# Altium PCB 400535.PcbDoc (part 1 of 3)
Units mil, origin at the board's own origin, x right, y up, seen from the top; angles counter-clockwise.
Board outline 2125.98 x 2500 mil, 4 copper layers (Top Layer, Mid-Layer 1, Mid-Layer 2, Bottom Layer), stack 93.792 mil thick; 80 components, 40 nets, 250 pads, 682 vias.
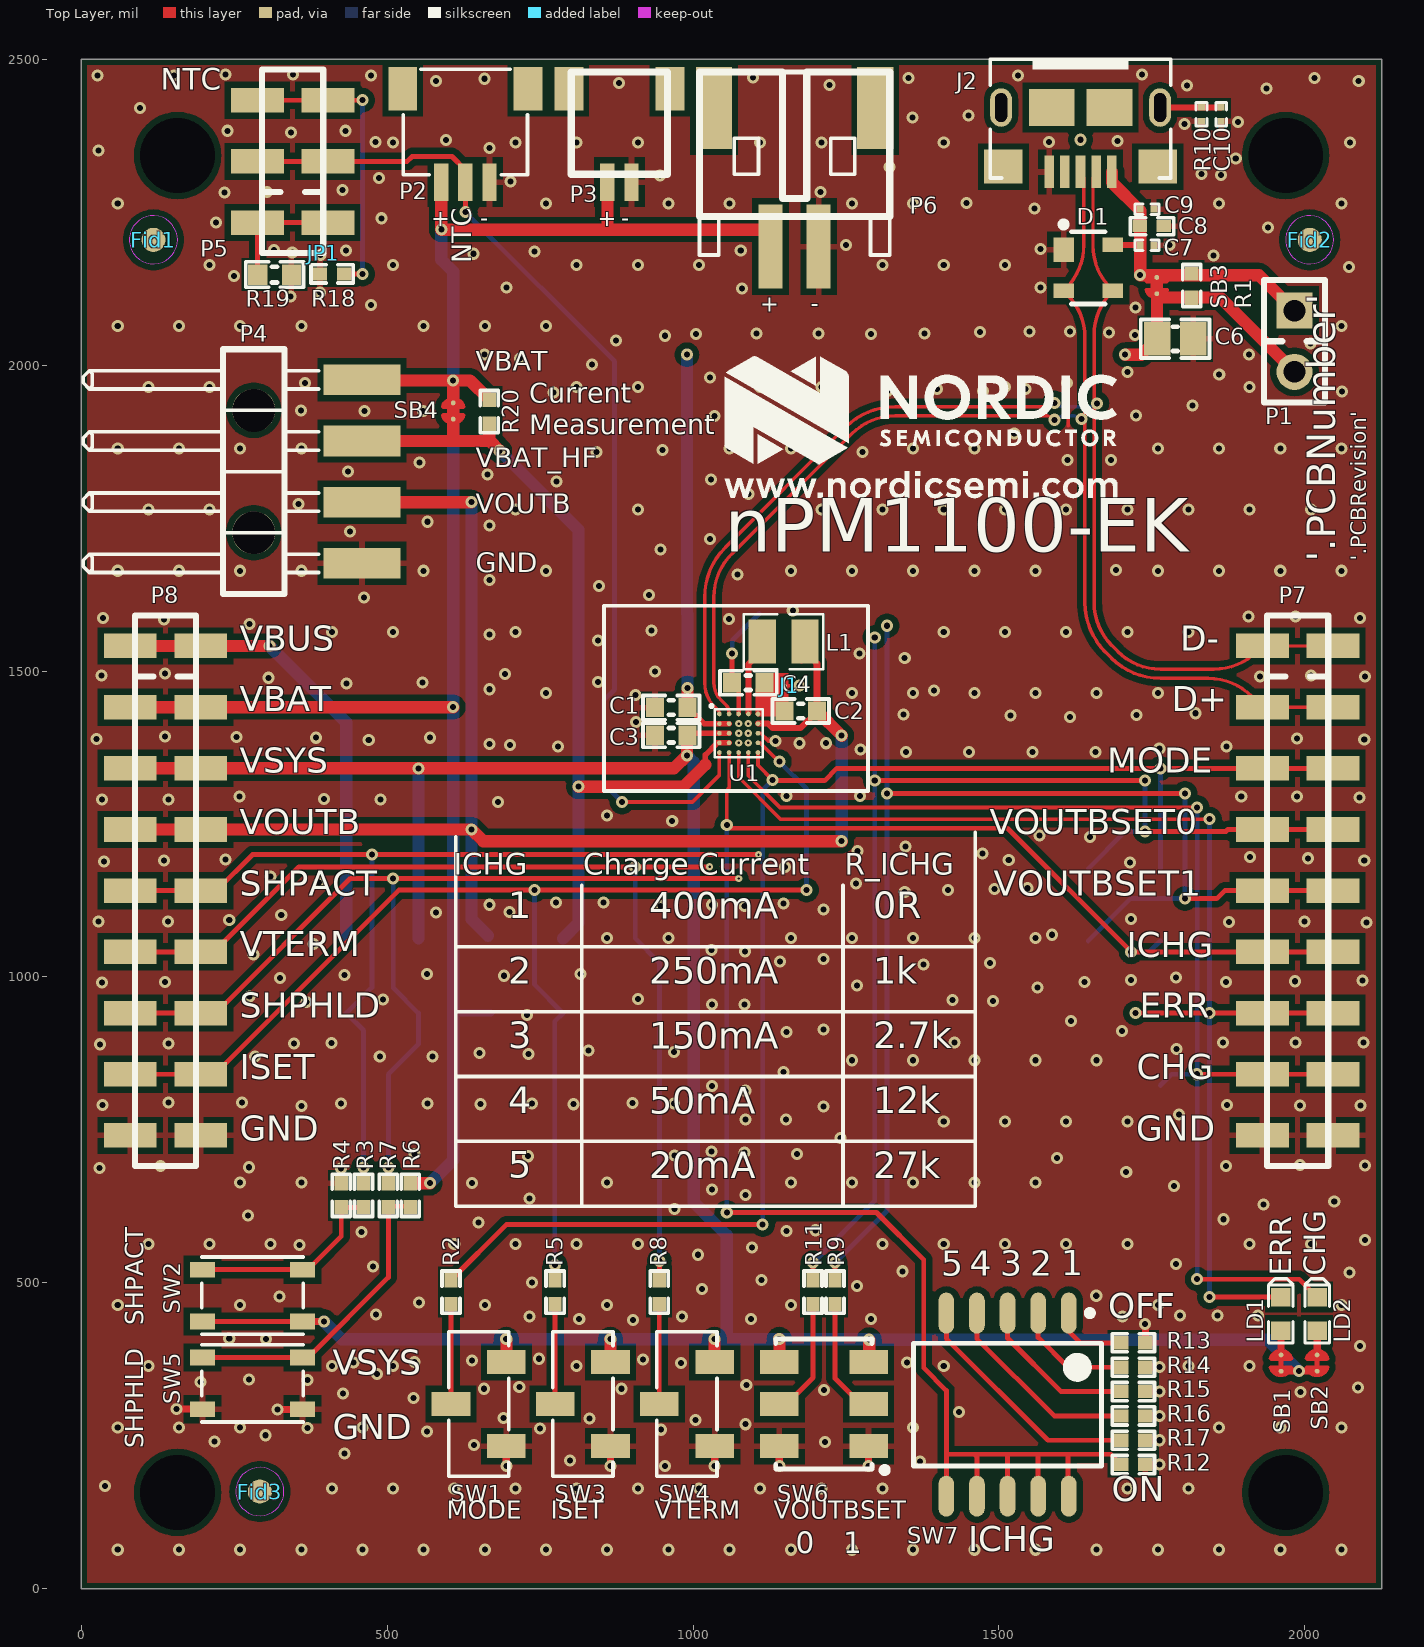
[diagram p0: Top Layer view]
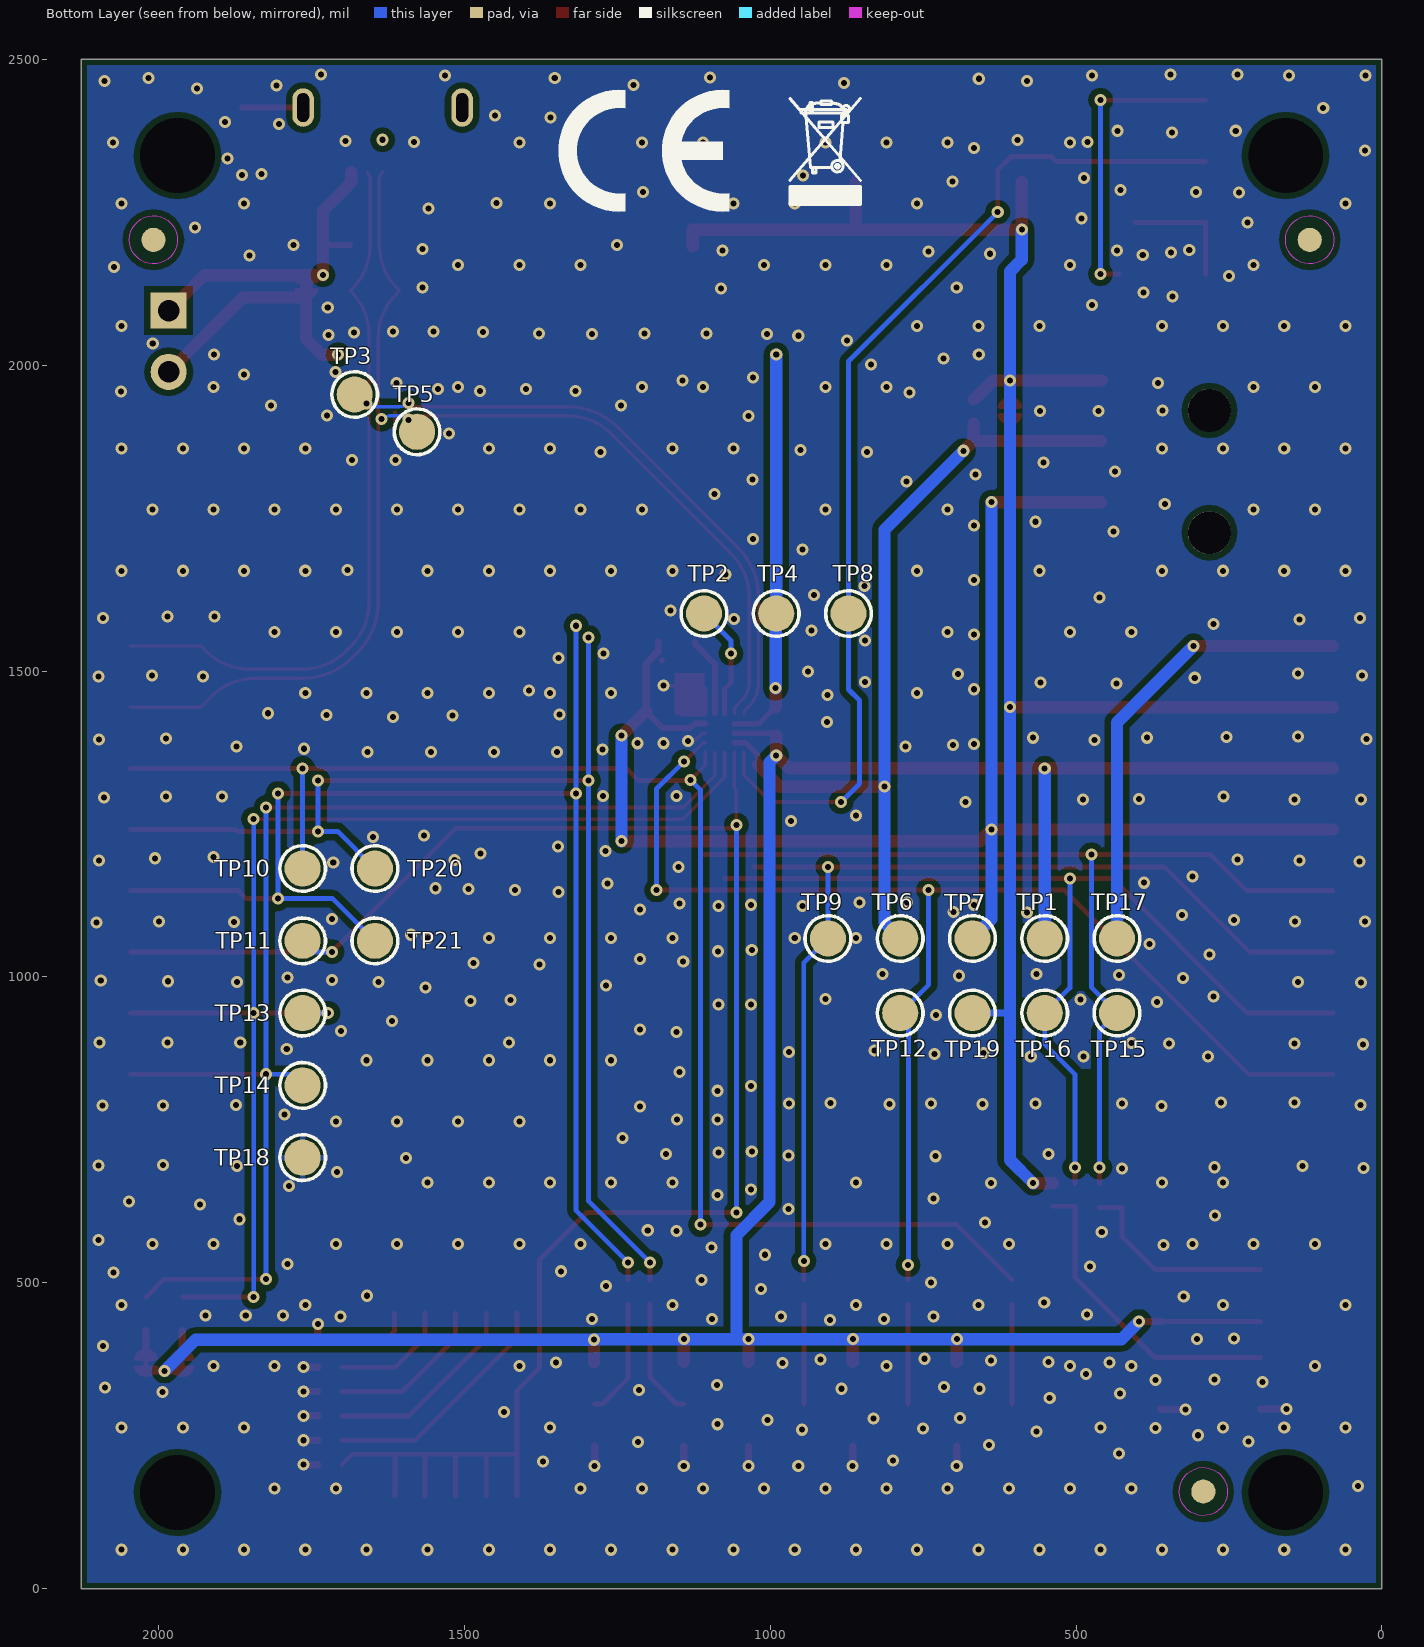
[diagram p1: Bottom Layer view, seen from below]
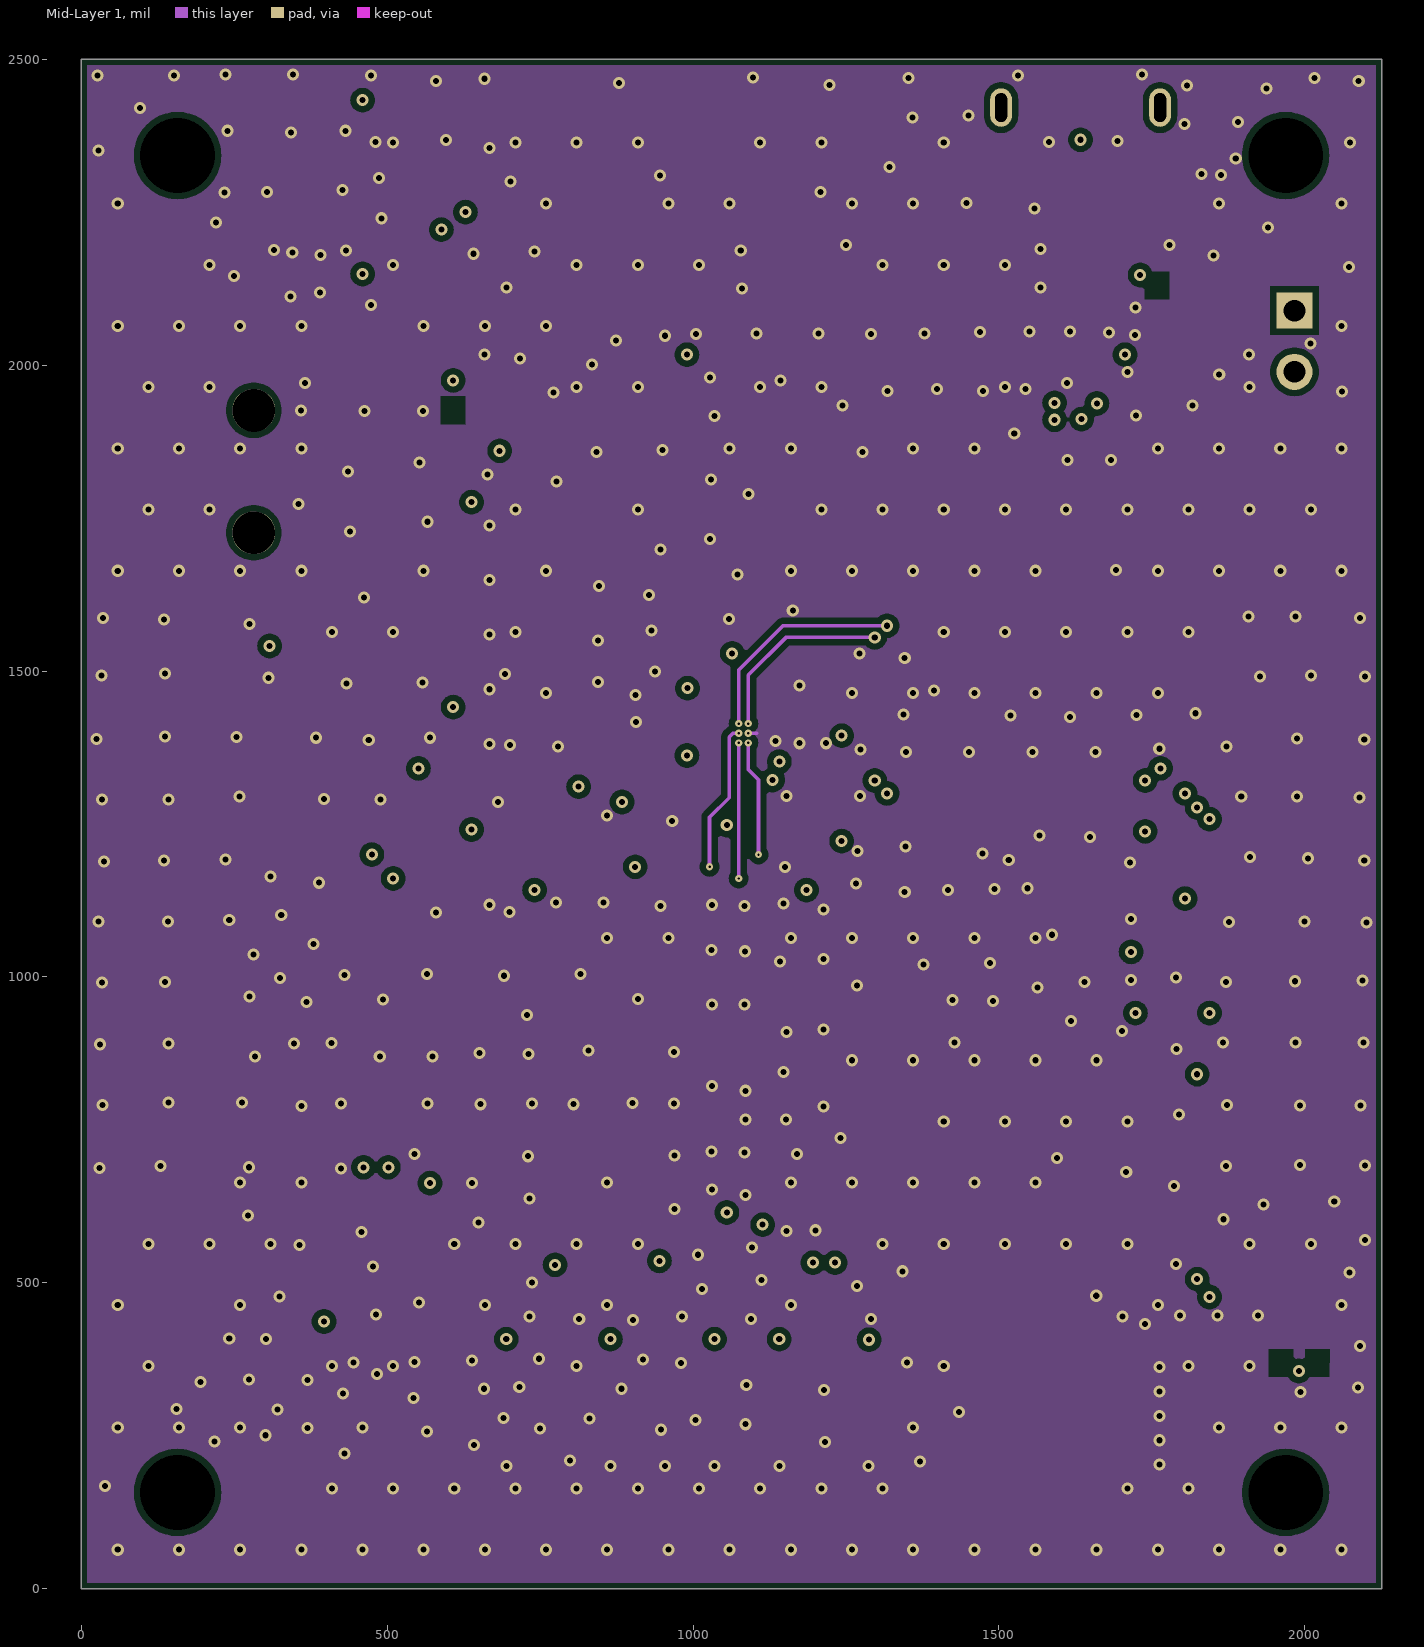
[diagram p2: Mid-Layer 1]
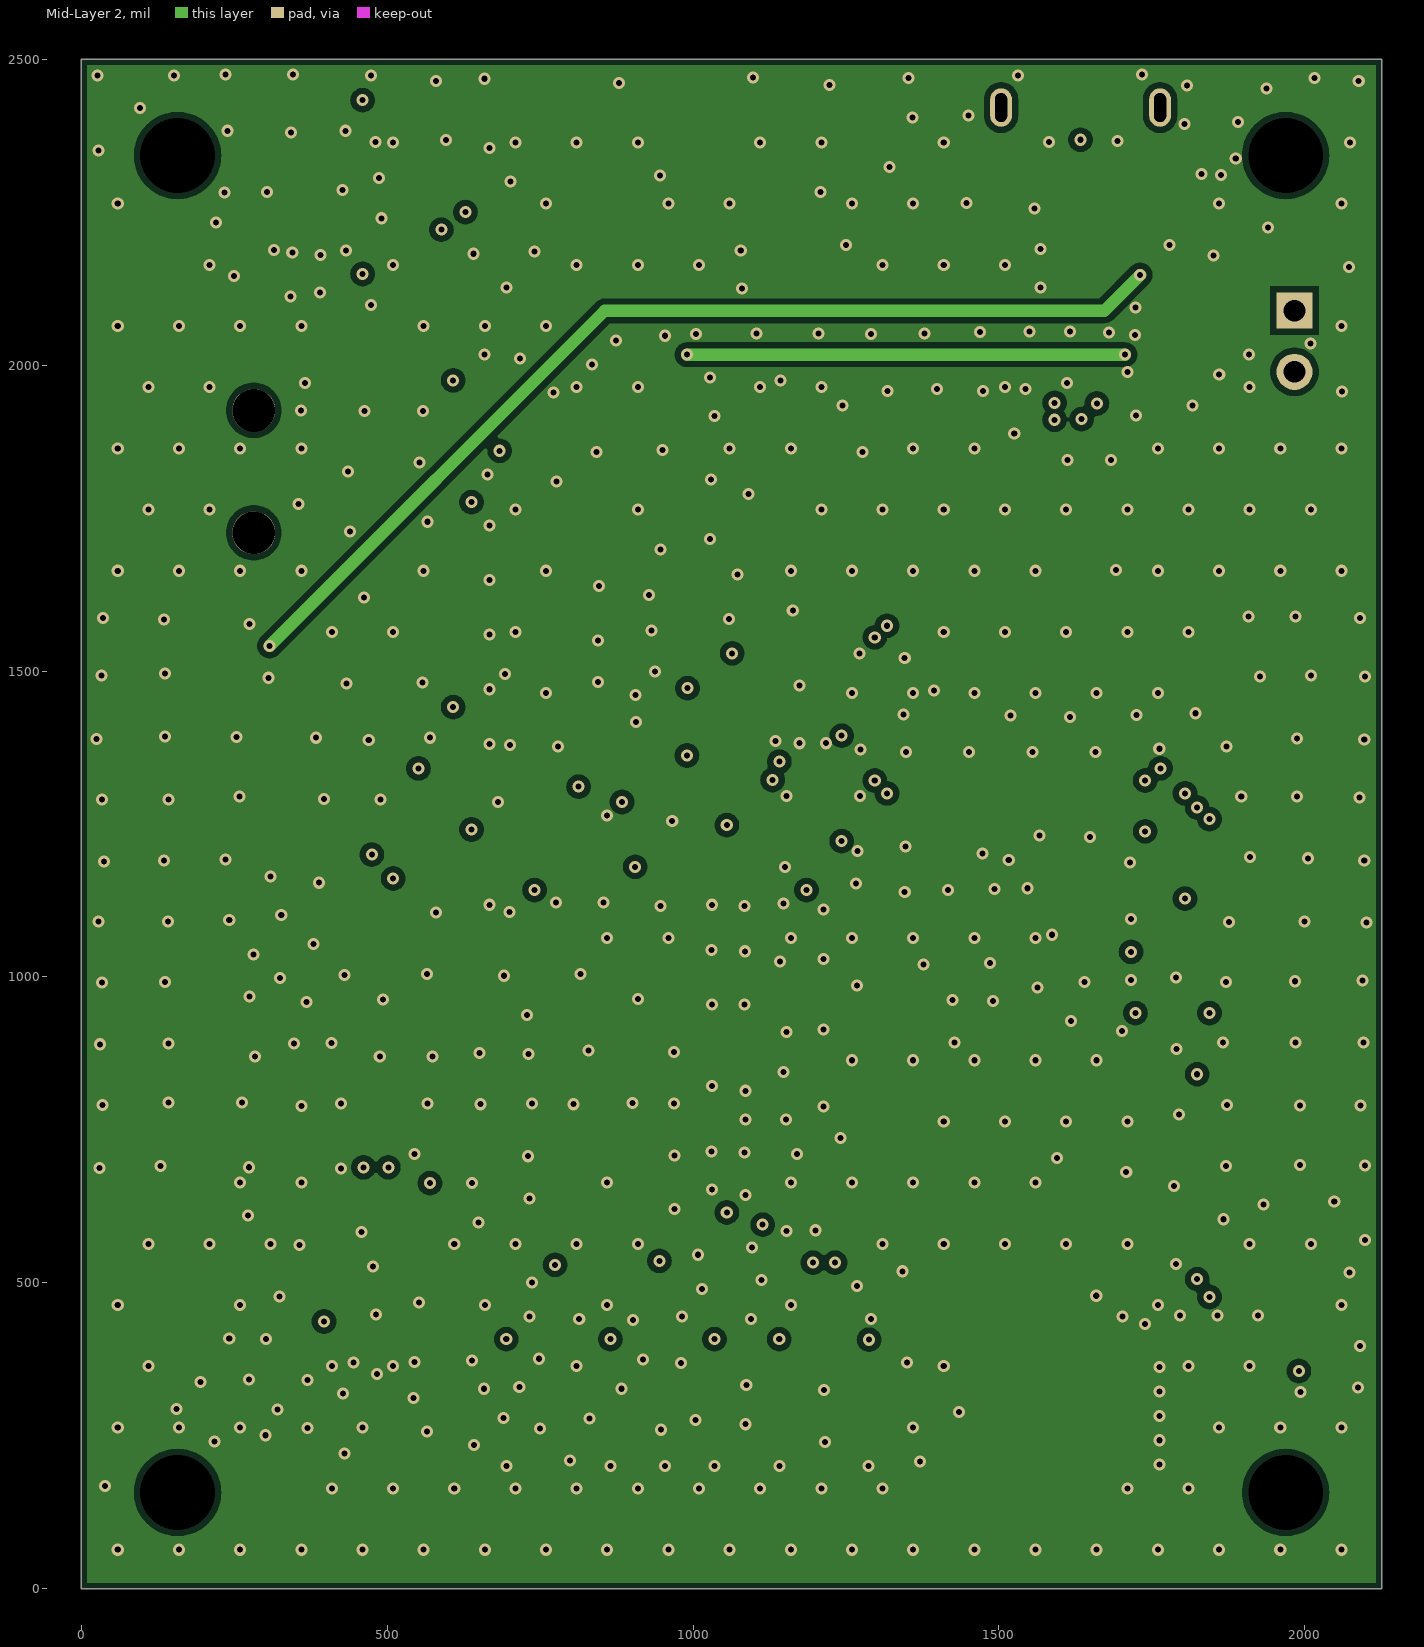
[diagram p3: Mid-Layer 2]
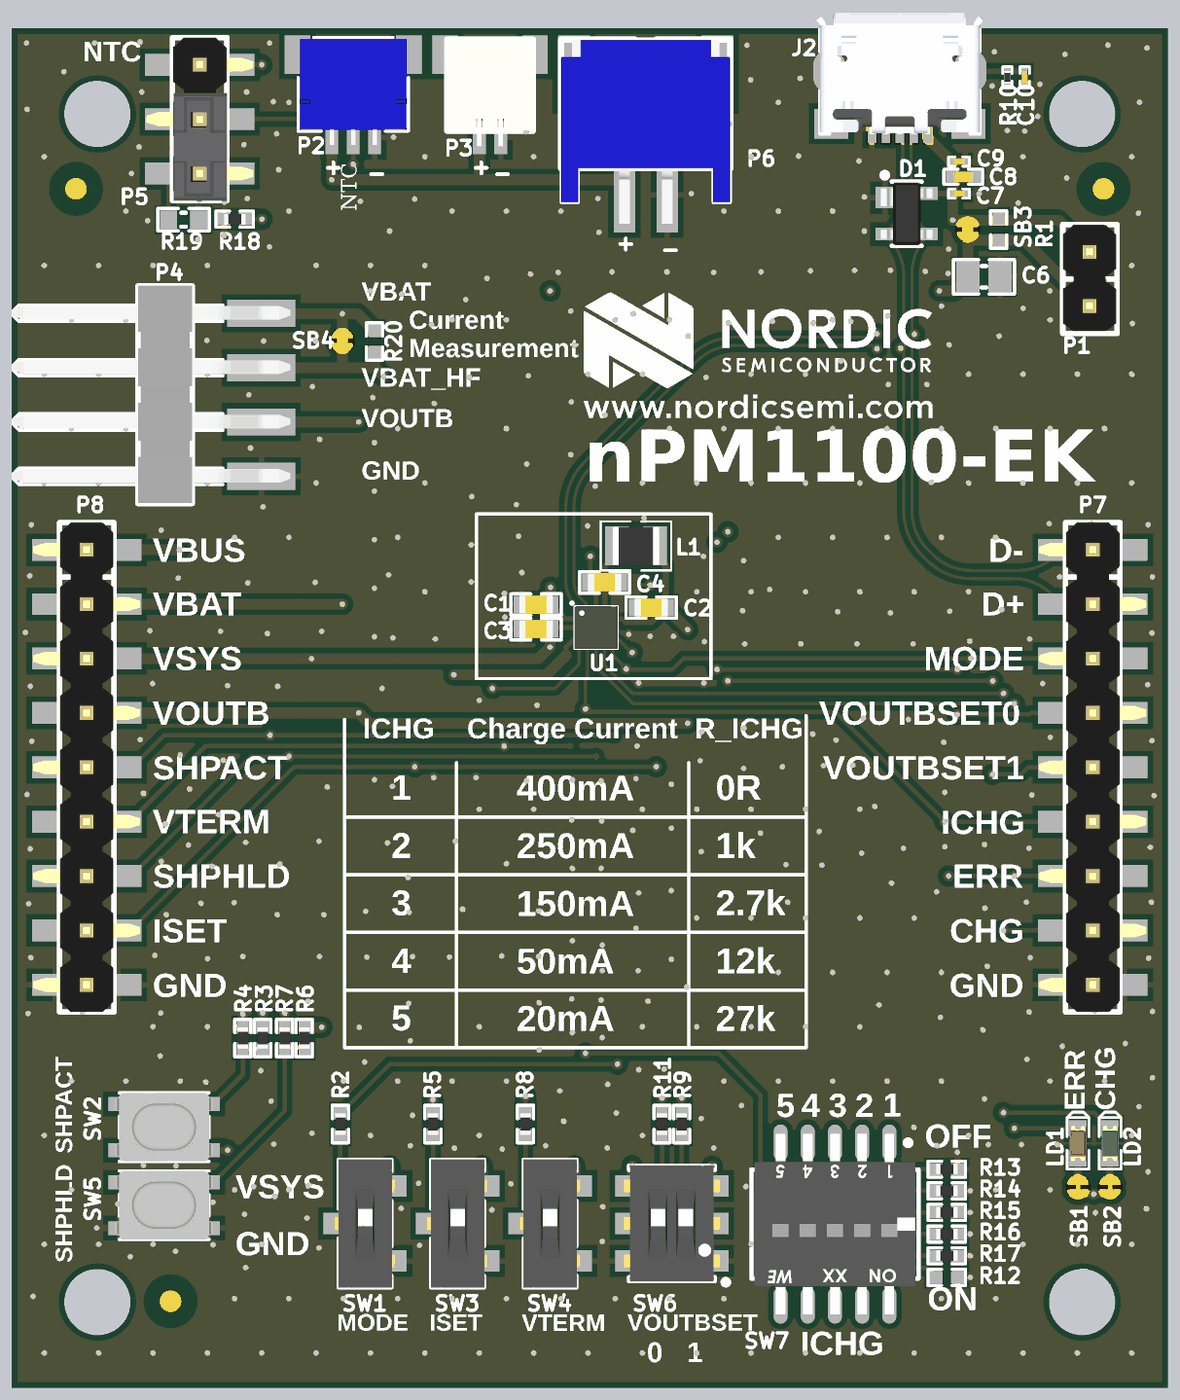
[diagram p5: 3D render of the assembled board from above, using the file's embedded part models]

## Layer stack, top to bottom
Top Solder: solder mask 0.4, Solder Resist, Dk 3.5
Top Layer: signal copper 1.4
Dielectric1: prepreg 62.9921, FR-4, Dk 4.8
Mid-Layer 1: signal copper 1.4
Dielectric2: core 12.6, FR-4, Dk 4.8
Mid-Layer 2: signal copper 1.4
Dielectric3: prepreg 12.6, FR-4, Dk 4.8
Bottom Layer: signal copper 1.4
Bottom Solder: solder mask 0.4, Solder Resist, Dk 3.5

## Board outline
0,0 2125.98,0 2125.98,2500 0,2500

## Design rules (kind name [scope] priority, off if disabled: settings)
BoardOutlineClearance [All] p1: gap=10 ignorepadtopadclearanceinfootprint=FALSE except(0: Arc-SplitContinuation Track-SplitContinuation SMDPad-SplitContinuation THPad-SplitContinuation Via-SplitContinuation Fill-SplitContinuation Poly-SplitContinuation Region-SplitContinuation Text-SplitContinuation)
Clearance Clearance_microvia [AsMM(ViaDiameter) = 0.3 vs AsMM(ViaDiameter) = 0.3] p1: gap=3.94 ignorepadtopadclearanceinfootprint=FALSE except(0: Arc-Hole Track-Hole SMDPad-Hole THPad-Hole Via-Hole Fill-Hole Poly-Hole Region-Hole Text-Hole)
Clearance ANT_Clerance [InNet('ANT')] p2: gap=5 ignorepadtopadclearanceinfootprint=FALSE except(0: Arc-Hole Track-Hole SMDPad-Hole THPad-Hole Via-Hole Fill-Hole Poly-Hole Region-Hole Text-Hole)
Clearance Polygon_Clearance [(InNamedPolygon('Top_Layer-GND')) or (InNamedPolygon('Bottom_Layer-GND')) or (InNamedPolygon('Mid_Layer_1-GND')) or (InNamedPolygon('Mid_Layer_2-GND'))] p3: gap=10 ignorepadtopadclearanceinfootprint=FALSE except(0: Arc-Hole Track-Hole SMDPad-Hole THPad-Hole Via-Hole Fill-Hole Poly-Hole Region-Hole Text-Hole)
Clearance [All] p4: gap=4.92 ignorepadtopadclearanceinfootprint=FALSE
ComponentClearance [All] p1 off: gap=10 collisioncheckmode=3 verticalgap=10 showdistances=FALSE
DiffPairsRouting [All] p1: maxlimit=10 minlimit=9.49 mostfreqgap=10 toplayer_prefgap=9.49 toplayer_minwidth=5.51 toplayer_maxwidth=15 toplayer_prefwidth=5.51 midlayer1_minwidth=5.51 midlayer1_maxwidth=15 midlayer1_prefwidth=11.06 midlayer2_mingap=10 midlayer2_minwidth=15 midlayer2_maxwidth=15 midlayer2_prefwidth=15 bottomlayer_prefgap=9.49 bottomlayer_minwidth=5.51 bottomlayer_maxwidth=15 bottomlayer_prefwidth=5.51 maxuncoupledlength=500
FabricationTestPointUsage TestPointUsage [All] p1: valid=0 allowmultiple=FALSE
FabricationTestpoint Testpoint [All] p1: side=3 testpointundercomponent=TRUE minsize=40 maxsize=100 preferedsize=60 minholesize=0 maxholesize=40 preferedholesize=32 testpointgrid=1 allowsidetop=TRUE allowsidebottom=TRUE usegrid=TRUE gridtolerance=0.01
Height [All] p1 off: minheight=0 maxheight=1000 prefheight=500
HoleSize [All] p1: absolutevalues=TRUE maxlimit=196.85 minlimit=3.94 maxpercent=80.000 minpercent=20.000
HoleToHoleClearance HoleToHoleClearance_L1L2 [InDrillLayerPair('Top Layer - Mid-Layer 1') vs InDrillLayerPair('Top Layer - Mid-Layer 1')] p1: gap=8.86 allowstackedmicrovias=TRUE
HoleToHoleClearance HoleToHoleClearance_L1L2_L1L3 [InDrillLayerPair('Top Layer - Mid-Layer 1') vs InDrillLayerPair('Top Layer - Mid-Layer 2')] p2: gap=8.86 allowstackedmicrovias=TRUE
HoleToHoleClearance HoleToHoleClearance_L1L3 [InDrillLayerPair('Top Layer - Mid-Layer 2') vs InDrillLayerPair('Top Layer - Mid-Layer 2')] p3: gap=8.86 allowstackedmicrovias=TRUE
HoleToHoleClearance HoleToHoleClearance_L1L3_L3L4 [InDrillLayerPair('Top Layer - Mid-Layer 2') vs InDrillLayerPair('Mid-Layer 2 - Mid-Layer 3')] p4: gap=8.86 allowstackedmicrovias=TRUE
HoleToHoleClearance HoleToHoleClearance_L3L4 [InDrillLayerPair('Mid-Layer 2 - Mid-Layer 3') vs InDrillLayerPair('Mid-Layer 2 - Mid-Layer 3')] p5: gap=8.86 allowstackedmicrovias=TRUE
HoleToHoleClearance HoleToHoleClearance_L3L4_L4L6 [InDrillLayerPair('Mid-Layer 2 - Mid-Layer 3') vs InDrillLayerPair('Mid-Layer 3 - Bottom Layer')] p6: gap=8.86 allowstackedmicrovias=TRUE
HoleToHoleClearance HoleToHoleClearance_L4L6 [InDrillLayerPair('Mid-Layer 3 - Bottom Layer') vs InDrillLayerPair('Mid-Layer 3 - Bottom Layer')] p7: gap=8.86 allowstackedmicrovias=TRUE
HoleToHoleClearance HoleToHoleClearance_L1L2_L1L6 [InDrillLayerPair('Top Layer - Mid-Layer 1') vs InDrillLayerPair('Top Layer - Bottom Layer')] p8: gap=10.83 allowstackedmicrovias=FALSE
HoleToHoleClearance HoleToHoleClearance_L1L3_L1L6 [InDrillLayerPair('Top Layer - Mid-Layer 2') vs InDrillLayerPair('Top Layer - Bottom Layer')] p9: gap=10.83 allowstackedmicrovias=FALSE
HoleToHoleClearance HoleToHoleClearance_L3L4_L1L6 [InDrillLayerPair('Mid-Layer 2 - Mid-Layer 3') vs InDrillLayerPair('Top Layer - Bottom Layer')] p10: gap=10.83 allowstackedmicrovias=FALSE
HoleToHoleClearance HoleToHoleClearance_L4L6_L1L6 [InDrillLayerPair('Mid-Layer 3 - Bottom Layer') vs InDrillLayerPair('Top Layer - Bottom Layer')] p11: gap=10.83 allowstackedmicrovias=FALSE
HoleToHoleClearance HoleToHoleClearance_L1L6 [InDrillLayerPair('Top Layer - Bottom Layer') vs InDrillLayerPair('Top Layer - Bottom Layer')] p12: gap=17.72 allowstackedmicrovias=FALSE
MinimumAnnularRing [All] p1 off: minimumring=6
PolygonConnect PolygonConnect_1 [isVia and innet(gnd)] p1: connectstyle=Direct reliefconductorwidth=10 reliefentries=4 polygonreliefangle="90 Angle" airgapwidth=10
PolygonConnect [All] p2: connectstyle=Relief reliefconductorwidth=10 reliefentries=4 polygonreliefangle="90 Angle" airgapwidth=10
RoutingVias [All] p1: holewidth=12 width=24 viastyle="Through Hole" minholewidth=3.94 minwidth=11.81 maxholewidth=28 maxwidth=50 useviatemplates=TRUE viatemplateguid#1={93AF73D0-991B-4F91-A86F-AF45B5E71B0E} viatemplateguid#2={23E904B5-25B2-4AFA-AFBF-BB17C8E28516} viatemplatename#1=v30h10m0 viatemplatename#2=v50h25m0mx0
SilkToSolderMaskClearance SilkscreenOverComponentPads [IsPad] p1: minsilkscreentomaskgap=10 clearancetoexposedcopper=TRUE
SolderMaskExpansion [IsVia] p1: expansion=3 istentingtop=TRUE
Width [All] p1: maxlimit=20 minlimit=5.91 preferedwidth=12 minimp=50.000000 maximp=50.000000 favimp=50.000000
22 further rules are at their usual default settings.

## Classes and differential pairs
component class pca10123_sheet1_cover: Fid1 Fid2 Fid3
component class pca10123-sheet2_nPM1100: C1 C2 C3 C4 J1 L1 TP1 TP2 TP3 TP4 TP5 TP6 TP7 TP8 TP9 TP10 TP11 TP12 TP13 TP14 TP15 TP16 TP18 TP20 TP21 U1
differential pair class USB2: D
component class pca10123-sheet3_misc: C6 C7 C8 C9 C10 D1 J2 JP1 LD1 LD2 P1 P2 P3 P4 P5 P6 P7 P8 R1 R2 R3 R4 R5 R6 R7 R8 R9 R10 R11 R12 R13 R14 R15 R16 R17 R18 R19 R20 SB1 SB2 SB3 SB4 SW1 SW2 SW3 SW4 SW5 SW6 SW7 TP17 TP19
differential pair D: +D_P -D_N

## Components (designator, comment, footprint, x,y, rotation, side; value= is the part's Value field where it differs from the comment)
C1 "2.2µF" CAPC1608X06L 964.39,1440.3 r0 top
C2 "10µF" CAPC1608X06L 1176,1434.72 r0 top
C3 "10µF" CAPC1608X06L 964.39,1395.02 r0 top
C4 "10µF" CAPC1608X06L 1090.37,1480.98 r180 top
C6 "DNM" CAPC2012X11L_NC 1788,2043 r180 top
C7 "100nF" CAPC0603X03L_C 1742,2196 r0 top
C8 "4.7µF" CAPC1005X04L 1750,2227 r0 top
C9 "10nF" CAPC0603X03L_C 1742,2255 r0 top
C10 "4.7nF" CAPC0603X03L_C 1863,2410 r270 top
D1 "PRTR5V0U2X" SOT190P230X110-4L 1646,2159 r0 top
Fid1 "Fiducial mark" Fiducial 118.11,2204.72 r90 top value=N.A.
Fid2 "Fiducial mark" Fiducial 2007.87,2204.72 r90 top value=N.A.
Fid3 "Fiducial mark" Fiducial 292,159 r90 top value=N.A.
J1 "N.A." "2 PIN STARPOINT" 1158.28,1476.06 r180 top net-tie
J2 "MicroUSB-B" USB-Micro-B-RA-SMD-PiP 1633.35,2315.65 r270 top locked
JP1 "Shunt 2.54mm" Shunt_2.54mm 395.68,2182.93 r90 top
L1 "2.2µH" INDC2016X10N 1148,1548 r0 top
LD1 "L0603G" LED_0603_R 1960.87,449.31 r270 top
LD2 "L0603G" LED_0603_G 2019.92,449.31 r270 top
P1 "Pin List 1x2" LIST_1x2 1983,2039 r270 top
P2 "HDR-3, 1mm" SM03B-SRSS-TB 628,2299.02 r180 top
P3 "HDR-2, 1mm" SM02B-SRSS-TB 879.74,2299.02 r180 top
P4 "Pin List 1x4, Angled" LIST_ANG_1x4-SMD-2.54MM 459.01,1826 r270 top
P5 "Pin List 1x3" LIST_1x3_SMD 345.68,2232.93 r90 top
P6 "HDR-2, 2mm" S2B-PH-SM4-TB 1166,2193.7 r180 top
P7 "Pin List 1x9" LIST_1x9_SMD 1988.19,1541 r270 top locked
P8 "Pin List 1x9" LIST_1x9_SMD 137.8,1541 r270 top
R1 "DNM" RESC1005X04L_NC 1815,2130.02 r90 top
R2 "10k" RESC1005X04L 604.45,485 r90 top
R3 "10k" RESC1005X04L 461.42,643 r90 top
R4 "10k" RESC1005X04L 425,643 r90 top
R5 "10k" RESC1005X04L 774.59,485 r90 top
R6 "10k" RESC1005X04L 538,643 r90 top
R7 "10k" RESC1005X04L 501.96,643 r90 top
R8 "10k" RESC1005X04L 944.72,485 r90 top
R9 "4k7" RESC1005X04L 1232,485 r90 top
R10 "1M0" RESC0603X03L_C 1831,2410 r270 top
R11 "4k7" RESC1005X04L 1196,485 r90 top
R12 "DNM" RESC1005X04L_NC 1719.68,203 r180 top
R13 "0R" RESC1005X04L 1719.68,402 r180 top
R14 "1k" RESC1005X04L 1719.68,362.2 r180 top
R15 "2k7" RESC1005X04L 1719.68,322.4 r180 top
R16 "12k" RESC1005X04L 1719.68,282.6 r180 top
R17 "27k" RESC1005X04L 1719.68,242.8 r180 top
R18 "10k" RESC1005X04L 410,2149 r0 top
R19 "DNM" RESC1608X06L_NC 316,2148 r180 top
R20 "DNM" RESC1005X04L_NC 667,1924 r90 top
SB1 "Solderbridge" Solderbridge_Shorted 1961,369 r90 top net-tie
SB2 "Solderbridge" Solderbridge_Shorted 2020,369 r90 top net-tie
SB3 "Solderbridge" Solderbridge_Shorted_Power 1758,2130.02 r270 top net-tie
SB4 "Solderbridge" Solderbridge_Shorted_Power 608,1925 r90 top net-tie
SW1 "Switch" CJS-120xA 649.72,302.01 r90 top
SW2 "PB SW" C&K_PTS810 280.01,479.25 r0 top
SW3 "Switch" CJS-120xA 819.86,302.01 r90 top
SW4 "Switch" CJS-120xA 990,302.01 r90 top
SW5 "PB SW" C&K_PTS810 280.01,335.72 r0 top
SW6 "Switch" CAS-D20A 1214,302.01 r90 top
SW7 "DIP-SW-5" SOIC127P840X265-10N 1514,301 r270 top
TP1 "Ø1.5mm,SMD" TP_SMD_D1.5mm 551.18,1062.99 r180 bottom
TP2 "Ø1.5mm,SMD" TP_SMD_D1.5mm 1108.11,1594 r180 bottom
TP3 "Ø1.5mm,SMD" TP_SMD_D1.5mm 1679,1952 r180 bottom
TP4 "Ø1.5mm,SMD" TP_SMD_D1.5mm 990,1594 r90 bottom
TP5 "Ø1.5mm,SMD" TP_SMD_D1.5mm 1577,1891 r180 bottom
TP6 "Ø1.5mm,SMD" TP_SMD_D1.5mm 787.4,1062.99 r270 bottom
TP7 "Ø1.5mm,SMD" TP_SMD_D1.5mm 669.29,1062.99 r270 bottom
TP8 "Ø1.5mm,SMD" TP_SMD_D1.5mm 871.89,1594 r270 bottom
TP9 "Ø1.5mm,SMD" TP_SMD_D1.5mm 905.51,1062.99 r270 bottom
TP10 "Ø1.5mm,SMD" TP_SMD_D1.5mm 1764,1177.17 r270 bottom
TP11 "Ø1.5mm,SMD" TP_SMD_D1.5mm 1764,1059.06 r270 bottom
TP12 "Ø1.5mm,SMD" TP_SMD_D1.5mm 787.4,941 r270 bottom
TP13 "Ø1.5mm,SMD" TP_SMD_D1.5mm 1764,940.95 r270 bottom
TP14 "Ø1.5mm,SMD" TP_SMD_D1.5mm 1764,822.84 r270 bottom
TP15 "Ø1.5mm,SMD" TP_SMD_D1.5mm 433.07,941 r270 bottom
TP16 "Ø1.5mm,SMD" TP_SMD_D1.5mm 551.18,941 r270 bottom
TP17 "Ø1.5mm,SMD" TP_SMD_D1.5mm 433.07,1062.99 r180 bottom
TP18 "Ø1.5mm,SMD" TP_SMD_D1.5mm 1764,704.73 r270 bottom
TP19 "Ø1.5mm,SMD" TP_SMD_D1.5mm 669.29,941 r180 bottom
TP20 "Ø1.5mm,SMD" TP_SMD_D1.5mm 1645.89,1177.17 r180 bottom
TP21 "Ø1.5mm,SMD" TP_SMD_D1.5mm 1645.89,1059.06 r180 bottom
U1 "nPM1100-CAAAC0" BGA25C40P5X5_200X200X50 1074.62,1398.31 r0 top locked

## Footprints (in the part's own frame and the unit in brackets; to place one, negate y for a bottom-side part, rotate by r counter-clockwise, add the part's x,y. Pads: shape width x height; smd on the part's side, far side on the other; paste and mask are expansions set on the pad)
"2 PIN STARPOINT" [mil]
  round 5.98 smd paste-196.85 mask-196.85: 1(8,0) 2(-8,0)
  Top Layer region: -11,-3 11,-3 11,3 -11,3
BGA25C40P5X5_200X200X50 [mm] "BGA, 25-Leads, Body 2.00x2.00mmx0.50mm, Pitch 0.40mm"
  round 0.193 smd mask+0.075: A1(-0.8,0.8) A2(-0.4,0.8) A3(0,0.8) A4(0.4,0.8) A5(0.8,0.8) B1(-0.8,0.4) B2(-0.4,0.4) B3(0,0.4) B4(0.4,0.4) B5(0.8,0.4) C1(-0.8,0) C2(-0.4,0) C3(0,0) C4(0.4,0) C5(0.8,0) D1(-0.8,-0.4) D2(-0.4,-0.4) D3(0,-0.4) D4(0.4,-0.4) D5(0.8,-0.4) E1(-0.8,-0.8) E2(-0.4,-0.8) E3(0,-0.8) E4(0.4,-0.8) E5(0.8,-0.8)
  silkscreen extent -1.18,-1 1,1.18, body extent -1,-1 1,1, height 0.5
C&K_PTS810 [mm] "Microminiature SMT Top Actuated"
  rect 1.05x0.65 smd: 1(-2.075,1.075) 1(2.075,1.075) 2(-2.075,-1.075) 2(2.075,-1.075)
  silkscreen extent -2.1,-1.6 2.1,1.6, body extent -2.29,-1.6 2.29,1.6, height 2.5
CAPC0603X03L_C [mm] "Chip Capacitor, 2-Leads, Body 0.6x0.3mm, IPC High Density"
  rect 0.27x0.3 smd mask+0.05: 1(-0.285,0) 2(0.285,0)
  silkscreen extent -0.49,-0.22 0.49,0.22, body extent -0.3,-0.15 0.31,0.15, height 0.3
CAPC1005X04L [mm] "Chip Capacitor, 2-Leads, Body 1.0x0.5mm, IPC High Density"
  rect 0.6x0.5 smd: 1(-0.5,0) 2(0.5,0)
  silkscreen extent -0.9,-0.35 0.9,0.35, body extent -0.51,-0.25 0.51,0.25, height 0.5
CAPC1608X06L [mm] "Chip Capacitor, 2-Leads, Body 1.6x0.8mm, IPC High Density"
  rect 0.75x0.8 smd: 1(-0.675,0) 2(0.675,0)
  silkscreen extent -1.17,-0.5 1.17,0.5, body extent -0.8,-0.43 0.8,0.43, height 0.8
CAPC2012X11L_NC [mm] "Chip Capacitor, 2-Leads, Body 2.0x1.3mm, IPC High Density"
  rect 1.1x1.4 smd: 1(-0.75,0) 2(0.75,0)
  silkscreen extent -1.43,-0.8 1.42,0.8
CAS-D20A [mm] "SLIDE SWITCH 2xSPDT J HOOK"
  rect 1x1.6 smd: 1(-1.75,-1.85) 2(0,-1.85) 3(1.75,-1.85) 4(-1.75,1.85) 5(0,1.85) 6(1.75,1.85)
  silkscreen extent -2.84,-2.62 2.7,2, body extent -2.7,-2.27 2.7,2.28, height 2.5
CJS-120xA [mm] "Slide Switches - SPDT, SMD, ON-ON"
  rect 1x1.6 smd: 1(1.75,-1.15) 2(0,1.15) 3(-1.75,-1.15)
  silkscreen extent -3,-1.25 3,1.25, body extent -3,-1.4 3,1.45, height 2.5
Fiducial [mm] "Fiducial Mark"
  round 1 smd paste-0.508: 0(0,0)
  round 1 smd far side paste-0.508: 0(0,0)
  Top Layer keep-out circle w0.01: c0,0 r1
  Bottom Layer keep-out circle w0.01: c0,0 r1
INDC2016X10N [mm] "Chip Inductor, 2-Leads, Body 2.00x1.60mm, IPC Medium Density"
  rect 1.13x1.82 smd: 1(-0.885,0) 2(0.885,0)
  silkscreen extent -1.65,-1.14 1.65,1.14, body extent -1.1,-0.9 1.1,0.9, height 1
LED_0603_G [mil] "SMD Super Bright LED, GREEN"
  rect 30x32 smd: 1(-27.5,0) 2(27.5,0)
  silkscreen extent -58,-20 48,20, body extent -32,-16 32,16, height 24
LED_0603_R [mil] "SMD Super Bright LED, RED"
  rect 30x32 smd: 1(-27.5,0) 2(27.5,0)
  silkscreen extent -58,-20 48,20, body extent -32,-16 32,16, height 24
LIST_1x2 [mm] "Pin List, 2.54mm through hole"
  rect 1.5x1.5 hole 0.9: 1(-1.27,0)
  round 1.5 hole 0.9: 2(1.27,0)
  silkscreen extent -2.54,-1.27 2.54,1.27, body extent -2.54,-1.27 2.44,1.23, height 8.2
LIST_1x3_SMD [mm] "Pin List, 2.54mm, SMD"
  rect 1.02x2.19 smd: 1(0,1.465) 1(0,-1.465) 2(2.54,-1.465) 2(2.54,1.465) 3(5.08,-1.465) 3(5.08,1.465)
  silkscreen extent -1.27,-1.27 6.35,1.27, body extent -1.27,-2.5 6.35,2.5, height 9.82
LIST_1x9_SMD [mm] "Pin List, 2.54mm, SMD"
  rect 1.02x2.19 smd: 1(0,1.465) 1(0,-1.465) 2(2.54,1.465) 2(2.54,-1.465) 3(5.08,-1.465) 3(5.08,1.465) 4(7.62,-1.465) 4(7.62,1.465) 5(10.16,-1.465) 5(10.16,1.465) 6(12.7,-1.465) 6(12.7,1.465) 7(15.24,-1.465) 7(15.24,1.465) 8(17.78,-1.465) 8(17.78,1.465) 9(20.32,-1.465) 9(20.32,1.465)
  silkscreen extent -1.27,-1.27 21.59,1.27, body extent -1.27,-2.5 21.59,2.5, height 9.82
LIST_ANG_1x4-SMD-2.54MM [mm] "Pin List, 2.54mm, Surface Mount, Angled"
  round 1.78 hole 1.78 unplated: 0(-2.54,-4.496) 0(2.54,-4.496)
  rect 1.27x3.18 smd: 1(-3.81,0) 2(-1.27,0) 3(1.27,0) 4(3.81,0)
  silkscreen extent -5.08,-11.58 5.08,-1.8, body extent -5.1,-11.61 5.06,1.35, height 3.03
RESC0603X03L_C [mm] "Chip Resistor, 2-Leads, Body 0.6x0.3mm, IPC High Density"
  rect 0.27x0.3 smd: 1(-0.285,0) 2(0.285,0)
  silkscreen extent -0.49,-0.22 0.49,0.22, body extent -0.3,-0.15 0.3,0.15, height 0.23
RESC1005X04L [mm] "Chip Resistor, 2-Leads, Body 1.0x0.5mm, IPC High Density"
  rect 0.6x0.55 smd mask+0.05: 1(-0.5,0) 2(0.5,0)
  silkscreen extent -0.87,-0.38 0.88,0.38, body extent -0.5,-0.25 0.5,0.25, height 0.3
RESC1005X04L_NC [mm] "Chip Resistor, 2-Leads, Body 1.0x0.5mm, IPC High Density"
  rect 0.6x0.55 smd mask+0.05: 1(-0.5,0) 2(0.5,0)
  silkscreen extent -0.87,-0.38 0.88,0.38
RESC1608X06L_NC [mm] "Chip Resistor, 2-Leads, Body 1.6x0.8mm, IPC High Density"
  rect 0.8x0.85 smd: 1(-0.7,0) 2(0.7,0)
  silkscreen extent -1.2,-0.53 1.2,0.53
S2B-PH-SM4-TB [mm] "JST, PH connector, side entry SMD, 2mm pitch"
  rect 1.5x3.4 smd: 0(-3.35,-5.75) 0(3.35,-5.75)
  rect 1x3.5 smd: 1(-1,0) 2(1,0)
  silkscreen extent -3.95,-7.25 3.95,0.35, body extent -3.95,-7.25 3.95,1.35, height 5.5
Shunt_2.54mm [mil]
  body extent 0,0 198,98, height 300
SM02B-SRSS-TB [mm] "JST, SH connector, side entry SMD, 1mm pitch"
  rect 1.2x1.8 smd: 0(-2.1,-3.875) 0(2.1,-3.875)
  rect 0.6x1.55 smd: 1(-0.5,0) 2(0.5,0)
  silkscreen extent -2,-4.57 2,-0.33, body extent -1.99,-4.58 1.99,0.41, height 3
SM03B-SRSS-TB [mm] "JST, SH connector, side entry SMD, 1mm pitch"
  rect 1.2x1.8 smd: 0(-2.6,-3.875) 0(2.6,-3.875)
  rect 0.6x1.55 smd: 1(-1,0) 2(0,0) 3(1,0)
  silkscreen extent -2.57,-4.68 2.58,-0.3, body extent -2.5,-4.61 2.5,0.34, height 2.95
SOIC127P840X265-10N [mm] "SOIC, 10-Leads, Body 7.52x5.80mm, Pitch 1.27mm, IPC Medium Density"
  oval 1.7x0.65 smd: 1(-3.8,2.54) 2(-3.8,1.27) 3(-3.8,0) 4(-3.8,-1.27) 5(-3.8,-2.54) 6(3.8,-2.54) 7(3.8,-1.27) 8(3.8,0) 9(3.8,1.27) 10(3.8,2.54)
  silkscreen extent -3.92,-3.9 2.55,3.9, body extent -4.22,-3.76 4.22,3.76, height 2.6
Solderbridge_Shorted [mm]
  round 0.2 smd paste-10: 1(-0.338,0) 2(0.338,0)
  Top Layer region: -0.102,-0.432 -0.178,-0.505 -0.296,-0.467 -0.361,-0.424 -0.434,-0.351 -0.488,-0.292 -0.546,-0.193 -0.574,-0.099 -0.569,0.122 -0.544,0.193 -0.46,0.33 -0.376,0.411 -0.284,0.469 -0.183,0.5 -0.132,0.483 -0.102,0.43
  Top Layer region: 0.102,0.432 0.178,0.505 0.296,0.467 0.361,0.424 0.434,0.351 0.488,0.292 0.546,0.193 0.574,0.099 0.569,-0.122 0.544,-0.193 0.46,-0.33 0.376,-0.411 0.284,-0.469 0.183,-0.5 0.132,-0.483 0.102,-0.43
  Top Layer lines w0.152: -0.178,0.431 ccw(c-0.068,0) -0.178,-0.431 ; 0.178,0.431 cw(c0.068,0) 0.178,-0.431
  Top Layer lines w0.203: -0.338,0 0.338,0
Solderbridge_Shorted_Power [mm]
  round 0.2 smd paste-10: 1(-0.338,0) 2(0.338,0)
  Top Layer region: -0.102,-0.432 -0.178,-0.505 -0.296,-0.467 -0.361,-0.424 -0.434,-0.351 -0.488,-0.292 -0.546,-0.193 -0.574,-0.099 -0.569,0.122 -0.544,0.193 -0.46,0.33 -0.376,0.411 -0.284,0.469 -0.183,0.5 -0.132,0.483 -0.102,0.43
  Top Layer region: 0.102,0.432 0.178,0.505 0.296,0.467 0.361,0.424 0.434,0.351 0.488,0.292 0.546,0.193 0.574,0.099 0.569,-0.122 0.544,-0.193 0.46,-0.33 0.376,-0.411 0.284,-0.469 0.183,-0.5 0.132,-0.483 0.102,-0.43
  Top Layer lines w0.152: 0.178,-0.431 ccw(c0.068,0) 0.178,0.431 ; -0.178,-0.431 cw(c-0.068,0) -0.178,0.431
  Top Layer lines w0.508: 0.338,0 -0.338,0
SOT190P230X110-4L [mm] "SOT143, 4-Leads, Body 3.0x2.5mm (max), Pitch 1.90mm, IPC High Density"
  rect 0.85x1 smd: 1(-1.025,0.75)
  rect 0.85x0.6 smd: 2(-1.025,-0.95) 3(1.025,-0.95) 4(1.025,0.95)
  silkscreen extent -1.15,-1.5 0.7,1.92, body extent -1.21,-1.46 1.21,1.46, height 1
TP_SMD_D1.5mm [mm] "Test point - pad 1.5mm"
  round 1.5 smd paste-5: 1(0,0)
  silkscreen extent -0.95,-0.95 0.95,0.95, body extent -0.75,-0.75 0.75,0.75, height 0.05
USB-Micro-B-RA-SMD-PiP [mm] "Micro USB B SMT"
  rect 1.35x0.4 smd mask+0.075: 1(0,1.3) 2(0,0.65) 3(0,0) 4(0,-0.65) 5(0,-1.3)
  oval 1.6x0.9 hole 0.5 slot 1.2 at 0 deg: 6(-2.675,3.3) 6(-2.675,-3.3)
  oval 2x1.5 on Top Paste: 6(-2.675,3.3) 6(-2.675,-3.3)
  rect 1.55x1.9 smd: 6(-2.675,1.2) 6(-2.675,-1.2)
  rect 1.4x1.6 smd: 6(-0.225,3.2) 6(-0.225,-3.2)
  silkscreen extent -4.75,-3.75 0.25,3.75, body extent -5.43,-3.93 0.28,3.93, height 2.84

## Part data
C1: library part C0603-2µ2-25V-X5R, "Capacitor, Ceramic, X5R, ±10%, 25V", Manufacturer=Murata, Manufacturer Part Number=GRM188R61E225KA12D, Part number IPS=N.A., Supplier Part Number 1=490-10731-1-ND, Artikkelnr Noca=N.A., Author=rsk, Component Class=Capacitors, ComponentLink1Description=Datasheet, ComponentLink1URL=https://search.murata.co.jp/Ceramy/image/img/A01X/G101/ENG/GRM188R61E225KA12-01.pdf, ComponentLink2Description="Supplier link", ComponentLink2URL=https://www.murata.com/en-global/products/productdetail?partno=GRM188R61E225KA12%23, Footprint Doc=0603, HelpURL=N.A., LatestRevisionDate=2020-12-16, Note=25V, Pad Count=2, Part Number=C0603-2µ2-25V-X5R, Part number Norautron=N.A., PartId=100200454, Published=2020-12-16, Supplier 1=Digi-Key, Supplier 2=Mouser, Supplier Part Number 2=81-GRM188R61E225KA2D
C2 C3 C4: library part 0603-10u-10V-X7T-GRM188, "CAP CER 10UF 10V X7T 0603", Manufacturer=Murata, Manufacturer Part Number=GRM188D71A106MA73, Part number IPS=00000004696, Part number Norautron=N.A., Supplier Part Number 1=490-7200-1-ND, Artikkelnr Noca=N.A., Author=rsk, Component Class=Capacitors, ComponentLink1Description=Datasheet, ComponentLink1URL=N.A., ComponentLink2Description="Supplier link", ComponentLink2URL=N.A., Footprint Doc=0603, HelpURL=https://no.mouser.com/datasheet/2/281/murata_03052018_GRM_Series_1-1310166.pdf, LatestRevisionDate=2020-10-13, Note=10VDC, Pad Count=2, Part Number=0603-10u-10V-X7T-GRM188, PartId=100200414, Published=2018-09-11, Publisher="Nordic Semiconductor", Supplier 1=Digi-Key, Supplier 2=Mouser, Supplier Part Number 2=81-GRM188D71A106MA3D
C6: library part C0805-N.C., "Not mounted", Manufacturer=N.A., Artikkelnr Noca=N.A., Assembly="Not mounted", Author=rsk, Component Class=Capacitors, ComponentLink1Description=Datasheet, ComponentLink1URL=N.A., ComponentLink2Description="Supplier link", ComponentLink2URL=N.A., Footprint Doc=0805, HelpURL=N.A., LatestRevisionDate=2013-06-04, Manufacturer Part Number=N.A., Note="Chip Cap", Pad Count=2, Part Number=C0805-N.C., Part number IPS=N.A., Part number Norautron=N.A., PartId=100200278, Published=2009-05-08, Publisher="Nordic Semiconductor", Supplier 1=N.A., Supplier 2=N.A., Supplier Part Number 1=N.A., Supplier Part Number 2=N.A.
C7: library part C0201-100n, "Capacitor, X5R, ±10%", Manufacturer=N.A., Part number IPS="00000001248, 00000002505", Artikkelnr Noca=N.A., Author=rsk, Component Class=Capacitors, ComponentLink1Description=Datasheet, ComponentLink1URL=N.A., ComponentLink2Description="Supplier link", ComponentLink2URL=N.A., Footprint Doc=0201, HelpURL=N.A., LatestRevisionDate=2017-11-09, Manufacturer Part Number=N.A., Note=16V, Pad Count=2, Part Number=C0201-100n, Part number Norautron=N.A., PartId=100200078, Published=2014-11-13, Publisher="Nordic Semiconductor", Supplier 1=N.A., Supplier 2=N.A., Supplier Part Number 1=N.A., Supplier Part Number 2=N.A.
C8: library part C0402-4µ7, "Capacitor, X5R, ±20%", Manufacturer=N.A., Part number IPS="00000001251, 00000007165", Supplier Part Number 1=490-13252-1-ND, Artikkelnr Noca=20039482, Author=rsk, Component Class=Capacitors, ComponentLink1Description=Datasheet, ComponentLink1URL=N.A., ComponentLink2Description="Supplier link", ComponentLink2URL=N.A., Footprint Doc=0402, HelpURL=N.A., LatestRevisionDate=2017-11-09, Manufacturer Part Number=N.A., Note=10V, Pad Count=2, Part Number=C0402-4µ7, Part number Norautron=N.A., PartId=100200193, Published=2009-05-08, Publisher="Nordic Semiconductor", Supplier 1=Digi-Key, Supplier 2=N.A., Supplier Part Number 2=N.A.
C9: library part C0201-10n, "Capacitor, X7R, ±10%", Manufacturer=N.A., Part number IPS=00000003480, Artikkelnr Noca=N.A., Author=rsk, Component Class=Capacitors, ComponentLink1Description=Datasheet, ComponentLink1URL=N.A., ComponentLink2Description="Supplier link", ComponentLink2URL=N.A., Footprint Doc=0201, HelpURL=N.A., LatestRevisionDate=2017-11-09, Manufacturer Part Number=N.A., Note=10V, Pad Count=2, Part Number=C0201-10n, Part number Norautron=N.A., PartId=100200067, Published=2014-11-13, Publisher="Nordic Semiconductor", Supplier 1=N.A., Supplier 2=N.A., Supplier Part Number 1=N.A., Supplier Part Number 2=N.A.
C10: library part C0201-4n7, "Chip Cap 0201 4.7nF 10% 10V X7R", Manufacturer=N.A., Part number IPS=00000001243, Artikkelnr Noca=N.A., Assembly=DNM, Author=rsk, Component Class=Capacitors, ComponentLink1Description=Datasheet, ComponentLink1URL=N.A., ComponentLink2Description="Supplier link", ComponentLink2URL=N.A., Footprint Doc=0201, HelpURL=N.A., LatestRevisionDate=2020-10-13, Manufacturer Part Number=N.A., Note="Chip Cap 1%", Pad Count=2, Part Number=C0201-4n7, Part number Norautron=N.A., PartId=100200063, Published=2014-11-13, Publisher="Nordic Semiconductor", Supplier 1=N.A., Supplier 2=N.A., Supplier Part Number 1=N.A., Supplier Part Number 2=N.A.
D1: "Ultra low capacitance double rail-to-rail ESD protection diode", Manufacturer="NXP Semiconductors", Part number IPS=00000009951, Part number Norautron=N.A., Supplier Part Number 1=568-4140-1-ND, Artikkelnr Noca=10069015, Author=rsk, Component Class=Semiconductors, ComponentLink1Description=Datasheet, ComponentLink1URL=N.A., ComponentLink2Description="Supplier link", ComponentLink2URL=N.A., Footprint Doc=SOT-143B, HelpURL=http://www.farnell.com/datasheets/109718.pdf, LatestRevisionDate=2017-11-09, Manufacturer Part Number=PRTR5V0U2X, Note=N.A., Pad Count=4, Part Number=PRTR5V0U2X, PartId=101300082, Published=2012-06-11, Publisher="Nordic Semiconductor", Supplier 1=Digi-Key, Supplier 2=Farnell, Supplier Part Number 2=152-4157
Fid1 Fid2 Fid3: library part Fid-Mark, "Fiducial Mark", Manufacturer=N.A., Artikkelnr Noca=N.A., Author=rsk, Component Class=Connectors, ComponentLink1Description=Datasheet, ComponentLink1URL=N.A., ComponentLink2Description="Supplier link", ComponentLink2URL=N.A., Footprint Doc=Fiducial, HelpURL=N.A., LatestRevisionDate=2009-12-12, Manufacturer Part Number=N.A., Note=N.A., Pad Count=1, Part Number=Fid-Mark, Part number IPS=N.A., Part number Norautron=N.A., PartId=100500073, Pin Count=1, Published=2009-12-12, Publisher="Nordic Semiconductor", Supplier 1=N.A., Supplier 2=N.A., Supplier Part Number 1=N.A., Supplier Part Number 2=N.A.
J1: library part "2 pin starpoint", "Starpoint", Artikkelnr Noca=N.A., Author=rsk, Component Class=Connectors, ComponentLink1Description=Datasheet, ComponentLink1URL=N.A., ComponentLink2Description="Supplier link", ComponentLink2URL=N.A., Footprint Doc=N.A., HelpURL=N.A., LatestRevisionDate=2017-08-31, Manufacturer=N.A., Manufacturer Part Number=N.A., Note=N.A., Pad Count=2, Part Number="2 pin starpoint", Part number IPS=N.A., Part number Norautron=N.A., PartId=100500603, Pin Count=2, Published=2017-08-31, Publisher="Nordic Semiconductor", Supplier 1=N.A., Supplier 2=N.A., Supplier Part Number 1=N.A., Supplier Part Number 2=N.A.
J2: library part USB-Micro-B-RA-SMD-PiP, "MicroUSB-B-SMT", Manufacturer="Allen Creations Corp.", Manufacturer Part Number=AJU55-BS2111-L, Part number IPS=00000007790, Part number Norautron=N.A., Artikkelnr Noca=55029020, Author=rsk, Component Class=Connectors, ComponentLink1Description=Datasheet, ComponentLink1URL=N.A., ComponentLink2Description="Supplier link", ComponentLink2URL=N.A., Footprint Doc=USB-Micro-B-RA-SMD-PiP, HelpURL="\\hizz\pro\app9717\Datasheet\connectors\Allen Creations Corp\AJU-211.pdf", LatestRevisionDate=2016-04-21, Note=N.A., Pad Count=5, Part Number=USB-Micro-B-RA-SMD-PiP, PartId=100500490, Pin Count=5, Published=2014-10-07, Publisher="Nordic Semiconductor", Supplier 1=Cabcon, Supplier 2=Digi-Key, Supplier Part Number 1=AJU55-BS2111-L, Supplier Part Number 2=609-4616-1-ND
JP1: library part "SHUNT JUMPER 2.54mm BLACK GOLD", "SHUNT JUMPER .1\" BLACK GOLD", Manufacturer=3M, Manufacturer Part Number=969102-0000-DA, Part number IPS=N.A., Supplier Part Number 1=3M9580-ND, Artikkelnr Noca=56099001, Author=rsk, Component Class=Connectors, ComponentLink1Description=Datasheet, ComponentLink1URL=N.A., ComponentLink2Description="Supplier link", ComponentLink2URL=N.A., Footprint Doc="SHUNT JUMPER 2.54mm", HelpURL=http://www.digikey.com/product-detail/en/969102-0000-DA, LatestRevisionDate=2012-07-06, Note="SHUNT JUMPER .1\" BLACK GOLD, h=6.00mm, w=5.00mm", Pad Count=2, Part Number="SHUNT JUMPER 2.54mm BLACK GOLD", Part number Norautron=N.A., PartId=100500392, Published=2012-07-06, Supplier 1=Digi-Key, Supplier 2=Cabcon, Supplier Part Number 2=3710-6001OSOB01
L1: library part CIGT201610EH2R2MNE, "FIXED IND 2.2UH 2.5A 87MOHM SMD", Manufacturer="Samsung Electro-Mechanics", Part number IPS=N.A., Supplier Part Number 1=1276-6901-1-ND, Artikkelnr Noca=N.A., Author=rsk, Component Class=Inductors, ComponentLink1Description=Datasheet, ComponentLink1URL=https://media.digikey.com/pdf/Data%20Sheets/Samsung%20PDFs/CIGT201610EH2R2MNE_Spec.pdf, ComponentLink2Description="Supplier link", ComponentLink2URL=https://www.digikey.com/en/products/detail/samsung-electro-mechanics/CIGT201610EH2R2MNE/7041223?s=N4IgTCBcDaIMIEkDiAVMAGAjANk%2BgogBJgBKYAsgHL4gC6AvkA, Footprint Doc=0806, HelpURL=http://product.samsungsem.com/pi/CIGT201610EH2R2MN.do, LatestRevisionDate=2021-02-03, Manufacturer Part Number=CIGT201610EH2R2MNE, Note="2.2µH Unshielded Thin Film Inductor 2.5A 87mOhm Max 0806 (2016 Metric)", Pad Count=2, Part Number=CIGT201610EH2R2MNE, Part number Norautron=N.A., PartId=100300400, Published=2021-02-03, Supplier 1=Digi-Key, Supplier 2=Mouser, Supplier Part Number 2=187-CIGT201610EH2R2M
LD1: library part ASMT-RR45-AQ902, "LED, Red, 0603, Vf=2V, - 40 to +100°C", Manufacturer=Avago, Part number IPS=N.A., Supplier Part Number 1=516-2005-1-ND, Artikkelnr Noca=N.A., Author=rsk, Component Class=Optoelectronics, ComponentLink1Description=Datasheet, ComponentLink1URL=N.A., ComponentLink2Description="Supplier link", ComponentLink2URL=N.A., Footprint Doc=0603, HelpURL=http://www.avagotech.com/docs/AV02-0378EN, LatestRevisionDate=2015-06-12, Manufacturer Part Number=ASMT-RR45-AQ902, Note="90 mcd @ 20 mA", Pad Count=2, Part Number=ASMT-RR45-AQ902, Part number Norautron=N.A., PartId=101400008, Published=2015-06-12, Publisher="Nordic Semiconductor", Supplier 1=Digi-Key, Supplier 2=Mouser, Supplier Part Number 2=630-ASMT-RR45-AQ902
LD2: library part ASMT-RF45-AN002, "LED, Yellow Green, 0603, Vf=2V, - 40 to +100°C", Manufacturer=Avago, Part number IPS=N.A., Supplier Part Number 1=516-2522-1-ND, Artikkelnr Noca=N.A., Author=rsk, Component Class=Optoelectronics, ComponentLink1Description=Datasheet, ComponentLink1URL=N.A., ComponentLink2Description="Supplier link", ComponentLink2URL=N.A., Footprint Doc=0603, HelpURL=http://www.avagotech.com/docs/AV02-0378EN, LatestRevisionDate=2015-06-12, Manufacturer Part Number=ASMT-RF45-AN002, Note="28 mcd @ 20 mA", Pad Count=2, Part Number=ASMT-RF45-AN002, Part number Norautron=N.A., PartId=101400010, Published=2015-06-12, Publisher="Nordic Semiconductor", Supplier 1=Digi-Key, Supplier 2=Mouser, Supplier Part Number 2=630-ASMT-RF45-AN002
P1: "Pin List 1x2, 2.54mm (100mil)", Manufacturer=N.A., Artikkelnr Noca=56019040, Assembly=DNM, Author=rsk, Component Class=Connectors, ComponentLink1Description=Datasheet, ComponentLink1URL=N.A., ComponentLink2Description="Supplier link", ComponentLink2URL=N.A., Footprint Doc=LIST_1x2, HelpURL=N.A., LatestRevisionDate=2009-12-12, Manufacturer Part Number=N.A., Note=N.A., Pad Count=2, Part Number="Pin List 1x2", Part number IPS=N.A., Part number Norautron=N.A., PartId=100500297, Published=2009-12-12, Publisher="Nordic Semiconductor", Supplier 1=N.A., Supplier 2=N.A., Supplier Part Number 1=N.A., Supplier Part Number 2=N.A.
P2: library part SM03B-SRSS-TB, "1.0mm pitch connector side entry SMD", Manufacturer="JST Sales America Inc.", Manufacturer Part Number=SM03B-SRSS-TB(LF)(SN), Part number IPS=00000001785, Part number Norautron=N.A., Artikkelnr Noca=N.A., Author=rsk, Component Class=Connectors, ComponentLink1Description=Datasheet, ComponentLink1URL=N.A., ComponentLink2Description="Supplier link", ComponentLink2URL=N.A., Footprint Doc=SM03B-SRSS-TB, HelpURL=http://www.jst-mfg.com/product/pdf/eng/eSH.pdf, LatestRevisionDate=2017-10-09, Note="JST, Header", Pad Count=3, Part Number=SM03B-SRSS-TB, PartId=100500605, Pin Count=3, Published=2017-10-09, Publisher="Nordic Semiconductor", Supplier 1=Cabcon, Supplier 2=Digi-Key, Supplier Part Number 1=SM03B-SRSS-TB(LF)(SN), Supplier Part Number 2=455-1803-1-ND
P3: library part SM02B-SRSS-TB, "1.0mm pitch connector side entry SMD", Manufacturer="JST Sales America Inc.", Manufacturer Part Number=SM02B-SRSS-TB(LF)(SN), Part number IPS=00000007791, Part number Norautron=N.A., Artikkelnr Noca=55010030, Author=rsk, Component Class=Connectors, ComponentLink1Description=Datasheet, ComponentLink1URL=N.A., ComponentLink2Description="Supplier link", ComponentLink2URL=N.A., Footprint Doc=SM02B-SRSS-TB, HelpURL=http://www.jst-mfg.com/product/pdf/eng/eSH.pdf, LatestRevisionDate=2016-06-20, Note="JST, Header", Pad Count=2, Part Number=SM02B-SRSS-TB, PartId=100500383, Pin Count=2, Published=2016-06-20, Publisher="Nordic Semiconductor", Supplier 1=Cabcon, Supplier 2=Digi-Key, Supplier Part Number 1=SM02B-SRSS-TB(LF)(SN), Supplier Part Number 2=455-1802-1-ND
P4: library part "Pin List Ang 1x4 SMD, 2.54mm", "Pin List 1x4, 2.54mm (100mil), Right Angled, SMD", Manufacturer=W-CON, Manufacturer Part Number=1125B-1104S0Z135CR02, Part number IPS=00000004780, Part number Norautron=N.A., Artikkelnr Noca=N.A., Author=rsk, Component Class=Connectors, ComponentLink1Description=Datasheet, ComponentLink1URL=N.A., ComponentLink2Description="Supplier link", ComponentLink2URL=N.A., Footprint Doc=LIST_ANG_1x4-SMD-2.54MM, HelpURL=N.A., LatestRevisionDate=2020-04-29, Note=N.A., Pad Count=4, Part Number="Pin List Ang 1x4 SMD, 2.54mm", PartId=100500358, Published=2015-01-23, Supplier 1=Cabcon, Supplier 2=Samtec, Supplier Part Number 1=1125B-1104S0Z135CR02, Supplier Part Number 2=TSM-104-01-L-SH-A
P5: library part "Pin List 1x3 SMD", "Pin List 1x3, 2.54mm (100mil), SMD", Manufacturer=W-CON, Manufacturer Part Number=1125-1103S3M116CR02, Part number IPS=N.A., Artikkelnr Noca=N.A., Author=rsk, Component Class=Connectors, ComponentLink1Description=Datasheet, ComponentLink1URL=N.A., ComponentLink2Description="Supplier link", ComponentLink2URL=N.A., Footprint Doc=LIST_1x3_SMD, HelpURL=N.A., LatestRevisionDate=2021-06-16, Note=N.A., Pad Count=3, Part Number="Pin List 1x3 SMD", Part number Norautron=N.A., PartId=100500306, Pin Count=3, Published=2013-10-21, Publisher="Nordic Semiconductor", Supplier 1=W-CON, Supplier 2=Samtec, Supplier Part Number 1=1125-1103S3M116CR02, Supplier Part Number 2=TSM-103-01-L-SV-P-TR
P6: library part S2B-PH-SM4-TB, "2.0mm pitch connector side entry SMD", Manufacturer="JST Sales America Inc.", Manufacturer Part Number=S2B-PH-SM4-TB(LF)(SN), Part number IPS=N.A., Artikkelnr Noca=N.A., Author=rsk, Component Class=Connectors, ComponentLink1Description=Datasheet, ComponentLink1URL=http://www.jst-mfg.com/product/pdf/eng/ePH.pdf, ComponentLink2Description="Supplier link", ComponentLink2URL=N.A., Footprint Doc=S2B-PH-SM4-TB, HelpURL=http://www.jst-mfg.com/product/pdf/eng/ePH.pdf, LatestRevisionDate=2015-12-22, Note="JST, Header", Pad Count=2, Part Number=S2B-PH-SM4-TB, Part number Norautron=N.A., PartId=100500381, Pin Count=2, Published=2015-12-22, Publisher="Nordic Semiconductor", Supplier 1=Cabcon, Supplier 2=Digi-Key, Supplier Part Number 1=S2B-PH-SM4-TB(LF)(SN), Supplier Part Number 2=455-1749-1-ND
P7 P8: library part "Pin List 1x9 SMD", "Pin List 1x9, 2.54mm (100mil), SMD", Manufacturer=W-CON, Manufacturer Part Number=1125-1109S0M116R2, Part number IPS=N.A., Artikkelnr Noca=55010024, Author=rsk, Component Class=Connectors, ComponentLink1Description=Datasheet, ComponentLink1URL=N.A., ComponentLink2Description="Supplier link", ComponentLink2URL=N.A., Footprint Doc=LIST_1x9_SMD, HelpURL=\\hizz\pro\app9717\Datasheet\connectors\W-CON\1125-11XXXXMXXXXX.pdf, LatestRevisionDate=2016-06-02, Note=N.A., Pad Count=9, Part Number="Pin List 1x9 SMD", Part number Norautron=N.A., PartId=100500333, Published=2016-03-29, Supplier 1=Cabcon, Supplier 2=Samtec, Supplier Part Number 1=1125-1109S0M116R2, Supplier Part Number 2=TSM-109-01-L-SV-P-TR
R1 R12 R20: library part R0402-N.C., "Not mounted", Manufacturer=N.A., Artikkelnr Noca=N.A., Assembly="Not mounted", Author=rsk, Component Class=Resistors, ComponentLink1Description=Datasheet, ComponentLink1URL=N.A., ComponentLink2Description="Supplier link", ComponentLink2URL=N.A., Footprint Doc=0402, HelpURL=N.A., LatestRevisionDate=2009-05-08, Manufacturer Part Number=N.A., Note="Chip Res", Pad Count=2, Part Number=R0402-N.C., Part number IPS=N.A., Part number Norautron=N.A., PartId=100100281, Published=2009-05-08, Supplier 1=N.A., Supplier 2=N.A., Supplier Part Number 1=N.A., Supplier Part Number 2=N.A.
  R1 R12: Publisher="Nordic Semiconductor"
R2 R3 R4 R5 R6 R7 R8 R18: library part R0402-10k, "Resistor, ±1%, 0.063W", Manufacturer=N.A., Part number IPS=00000002093, Supplier Part Number 1=173-8864, Artikkelnr Noca=27049097, Author=rsk, Component Class=Resistors, ComponentLink1Description=Datasheet, ComponentLink1URL=N.A., ComponentLink2Description="Supplier link", ComponentLink2URL=N.A., Footprint Doc=0402, HelpURL=N.A., LatestRevisionDate=2009-11-23, Manufacturer Part Number=N.A., Note="Chip Res 1%", Pad Count=2, Part Number=R0402-10k, Part number Norautron=N.A., PartId=100100198, Published=2009-05-08, Publisher="Nordic Semiconductor", Supplier 1=Farnell, Supplier 2=N.A., Supplier Part Number 2=N.A.
R9 R11: library part R0402-4K7, "Resistor, ±1%, 0.063W", Manufacturer=N.A., Part Number=R0402-4k7, Part number IPS=00000003433, Supplier Part Number 1=173-8858, Artikkelnr Noca=27049089, Author=rsk, Component Class=Resistors, ComponentLink1Description=Datasheet, ComponentLink1URL=N.A., ComponentLink2Description="Supplier link", ComponentLink2URL=N.A., Footprint Doc=0402, HelpURL=N.A., LatestRevisionDate=2009-11-23, Manufacturer Part Number=N.A., Note="Chip Res 1%", Pad Count=2, Part number Norautron=N.A., PartId=100100190, Published=2009-05-08, Publisher="Nordic Semiconductor", Supplier 1=Farnell, Supplier 2=N.A., Supplier Part Number 2=N.A.
R10: library part R0201-1M0, "Resistor, ±1%, 0.05W", Manufacturer=N.A., Part number IPS=00000001418, Artikkelnr Noca=N.A., Assembly=DNM, Author=rsk, Component Class=Resistors, ComponentLink1Description=Datasheet, ComponentLink1URL=N.A., ComponentLink2Description="Supplier link", ComponentLink2URL=N.A., Footprint Doc=0201, HelpURL=N.A., LatestRevisionDate=2014-11-13, Manufacturer Part Number=N.A., Note="Chip Res 1%", Pad Count=2, Part Number=R0201-1M0, Part number Norautron=N.A., PartId=100100093, Published=2014-11-13, Publisher="Nordic Semiconductor", Supplier 1=N.A., Supplier 2=N.A., Supplier Part Number 1=N.A., Supplier Part Number 2=N.A.
R13: library part R0402-0R, "Resistor, ±5%, 0.063W", Manufacturer=N.A., Part number IPS=00000007128, Supplier Part Number 1=146-9661, Artikkelnr Noca=27049000, Author=rsk, Component Class=Resistors, ComponentLink1Description=Datasheet, ComponentLink1URL=N.A., ComponentLink2Description="Supplier link", ComponentLink2URL=N.A., Footprint Doc=0402, HelpURL=N.A., LatestRevisionDate=2009-11-23, Manufacturer Part Number=N.A., Note="Chip Res 5%", Pad Count=2, Part Number=R0402-0R, Part number Norautron=N.A., PartId=100100109, Published=2009-05-08, Publisher="Nordic Semiconductor", Supplier 1=Farnell, Supplier 2=N.A., Supplier Part Number 2=N.A.
R14: library part R0402-1k0, "Resistor, ±1%, 0.063W", Manufacturer=N.A., Part number IPS=00000002218, Supplier Part Number 1=173-8850, Artikkelnr Noca=27049073, Author=rsk, Component Class=Resistors, ComponentLink1Description=Datasheet, ComponentLink1URL=N.A., ComponentLink2Description="Supplier link", ComponentLink2URL=N.A., Footprint Doc=0402, HelpURL=N.A., LatestRevisionDate=2009-11-23, Manufacturer Part Number=N.A., Note="Chip Res 1%", Pad Count=2, Part Number=R0402-1k0, Part number Norautron=N.A., PartId=100100171, Published=2009-05-08, Publisher="Nordic Semiconductor", Supplier 1=Farnell, Supplier 2=N.A., Supplier Part Number 2=N.A.
R15: library part R0402-2k7, "Resistor, ±1%, 0.063W", Manufacturer=N.A., Supplier Part Number 1=173-8855, Artikkelnr Noca=27049083, Author=rsk, Component Class=Resistors, ComponentLink1Description=Datasheet, ComponentLink1URL=N.A., ComponentLink2Description="Supplier link", ComponentLink2URL=N.A., Footprint Doc=0402, HelpURL=N.A., LatestRevisionDate=2009-11-23, Manufacturer Part Number=N.A., Note="Chip Res 1%", Pad Count=2, Part Number=R0402-2k7, Part number IPS=N.A., Part number Norautron=N.A., PartId=100100184, Published=2009-05-08, Publisher="Nordic Semiconductor", Supplier 1=Farnell, Supplier 2=N.A., Supplier Part Number 2=N.A.
R16: library part R0402-12k, "Resistor, ±1%, 0.063W", Manufacturer=N.A., Supplier Part Number 1=173-8865, Artikkelnr Noca=27049099, Author=rsk, Component Class=Resistors, ComponentLink1Description=Datasheet, ComponentLink1URL=N.A., ComponentLink2Description="Supplier link", ComponentLink2URL=N.A., Footprint Doc=0402, HelpURL=N.A., LatestRevisionDate=2009-11-23, Manufacturer Part Number=N.A., Note="Chip Res 1%", Pad Count=2, Part Number=R0402-12k, Part number IPS=N.A., Part number Norautron=N.A., PartId=100100201, Published=2009-05-08, Publisher="Nordic Semiconductor", Supplier 1=Farnell, Supplier 2=N.A., Supplier Part Number 2=N.A.
R17: library part R0402-27k, "Resistor, ±1%, 0.063W", Manufacturer=N.A., Part number IPS=00000004188, Supplier Part Number 1=173-8869, Artikkelnr Noca=27049107, Author=rsk, Component Class=Resistors, ComponentLink1Description=Datasheet, ComponentLink1URL=N.A., ComponentLink2Description="Supplier link", ComponentLink2URL=N.A., Footprint Doc=0402, HelpURL=N.A., LatestRevisionDate=2009-11-23, Manufacturer Part Number=N.A., Note="Chip Res 1%", Pad Count=2, Part Number=R0402-27k, Part number Norautron=N.A., PartId=100100215, Published=2009-05-08, Publisher="Nordic Semiconductor", Supplier 1=Farnell, Supplier 2=N.A., Supplier Part Number 2=N.A.
R19: library part R0603-N.C., "Not mounted", Manufacturer=N.A., Artikkelnr Noca=N.A., Assembly="Not mounted", Author=rsk, Component Class=Resistors, ComponentLink1Description=Datasheet, ComponentLink1URL=N.A., ComponentLink2Description="Supplier link", ComponentLink2URL=N.A., Footprint Doc=0603, HelpURL=N.A., LatestRevisionDate=2010-09-07, Manufacturer Part Number=N.A., Note="Chip Res", Pad Count=2, Part Number=R0603-N.C., Part number IPS=N.A., Part number Norautron=N.A., PartId=100100373, Published=2010-09-07, Publisher="Nordic Semiconductor", Supplier 1=N.A., Supplier 2=N.A., Supplier Part Number 1=N.A., Supplier Part Number 2=N.A.
SB1 SB2: library part "Solderbridge Shorted", "Shorted Solderbridge", Manufacturer=N.A., Artikkelnr Noca=N.A., Author=rsk, Component Class=Connectors, ComponentLink1Description=Datasheet, ComponentLink1URL=N.A., ComponentLink2Description="Supplier link", ComponentLink2URL=N.A., Footprint Doc=Solderbridge_Shorted, HelpURL=N.A., LatestRevisionDate=2012-08-07, Manufacturer Part Number=N.A., Note=N.A., Pad Count=2, Part Number="Solderbridge Shorted", Part number IPS=N.A., Part number Norautron=N.A., PartId=100500459, Pin Count=2, Published=2012-08-07, Publisher="Nordic Semiconductor", Supplier 1=N.A., Supplier 2=N.A., Supplier Part Number 1=N.A., Supplier Part Number 2=N.A.
SB3 SB4: library part "Solderbridge Shorted Power", "Shorted Solderbridge Power", Manufacturer=N.A., Artikkelnr Noca=N.A., Author=rsk, Component Class=Connectors, ComponentLink1Description=Datasheet, ComponentLink1URL=N.A., ComponentLink2Description="Supplier link", ComponentLink2URL=N.A., Footprint Doc=Solderbridge_Shorted_Power, HelpURL=N.A., LatestRevisionDate=2012-08-07, Manufacturer Part Number=N.A., Note=N.A., Pad Count=2, Part Number="Solderbridge Shorted Power", Part number IPS=N.A., Part number Norautron=N.A., PartId=100500460, Pin Count=2, Published=2012-08-07, Publisher="Nordic Semiconductor", Supplier 1=N.A., Supplier 2=N.A., Supplier Part Number 1=N.A., Supplier Part Number 2=N.A.
SW1 SW3 SW4: library part CJS-1200TA, "SMD slide Switch (ON-ON)", Manufacturer="Copal Electronics Inc", Part number IPS=00000009982, Part number Norautron=N.A., Supplier Part Number 1=563-1021-2-ND, Artikkelnr Noca=50019068, Author=rsk, Component Class=Switches, ComponentLink1Description=Datasheet, ComponentLink1URL=N.A., ComponentLink2Description="Supplier link", ComponentLink2URL=N.A., Footprint Doc=CJS-120xA, HelpURL=http://media.digikey.com/pdf/Data%20Sheets/COPAL%20Electronics%20PDFs/CJS.pdf, LatestRevisionDate=2012-10-03, Manufacturer Part Number=CJS-1200TA, Note=N.A., Pad Count=3, Part Number=CJS-1200TA, PartId=101500005, Published=2012-10-03, Publisher="Nordic Semiconductor", Supplier 1=Digi-Key, Supplier 2=N.A., Supplier Part Number 2=N.A.
SW2 SW5: library part "PTS810 SJK 250 SMTR LFS", "Tactile Switch, SPNO, SMD, 260gf, 4.2x3.2x2.5mm", Manufacturer=C&K, Part number IPS=00000001259, Part number Norautron=N.A., Supplier Part Number 1=CKN10503TR-ND, Artikkelnr Noca=N.A., Author=rsk, Component Class=Switches, ComponentLink1Description=Datasheet, ComponentLink1URL=N.A., ComponentLink2Description="Supplier link", ComponentLink2URL=N.A., Footprint Doc=PTS810, HelpURL=http://www.ckswitches.com/media/1476/pts810.pdf, LatestRevisionDate=2017-11-09, Manufacturer Part Number="PTS810 SJK 250 SMTR LFS", Note=N.A., Pad Count=4, Part Number="PTS810 SJK 250 SMTR LFS", PartId=101500104, Published=2017-09-18, Publisher="Nordic Semiconductor", Supplier 1=Digi-Key, Supplier 2=N.A., Supplier Part Number 2=N.A.
SW6: library part CAS-D20TA, "SMD slide Switch 2xSPDT", Manufacturer="Copal Electronics Inc", Part number IPS=N.A., Supplier Part Number 1=CASD20JTR-ND, Artikkelnr Noca=N.A., Author=rsk, Component Class=Switches, ComponentLink1Description=Datasheet, ComponentLink1URL=N.A., ComponentLink2Description="Supplier link", ComponentLink2URL=N.A., Footprint Doc=CAS-D20A, HelpURL=http://copal-electronics.info/jp/0019b/cas_ja.pdf, LatestRevisionDate=2012-10-08, Manufacturer Part Number=CAS-D20TA, Note=N.A., Pad Count=6, Part Number=CAS-D20TA, Part number Norautron=N.A., PartId=101500004, Published=2012-10-08, Publisher="Nordic Semiconductor", Supplier 1=Digi-Key, Supplier 2=N.A., Supplier Part Number 2=N.A.
SW7: library part DIP-SW5-SPST, "SWITCH SLIDE DIP SPST 25MA 24V", Manufacturer="Wurth Elektronik", Manufacturer Part Number=416131160805, Part number IPS=N.A., Supplier Part Number 1=732-3855-1-ND, Artikkelnr Noca=N.A., Author=rsk, Component Class=Switches, ComponentLink1Description=Datasheet, ComponentLink1URL=https://www.we-online.de/katalog/datasheet/4161311608xx.pdf, ComponentLink2Description="Supplier link", ComponentLink2URL=N.A., Footprint Doc=SOIC127P840X265-10N, HelpURL=https://www.digikey.com/products/en/switches/dip-switches/194?k=&pkeyword=&sv=0&pv89=7036&sf=1&FV=ii5%7C2245%2C-8%7C194&quantity=&ColumnSort=252&page=1&stock=1&pageSize=25, LatestRevisionDate=2020-01-07, Note=N.A., Pad Count=10, Part Number=DIP-SW5-SPST, Part number Norautron=N.A., PartId=101500125, Published=2020-01-07, Publisher="Nordic Semiconductor", Supplier 1=Digi-Key, Supplier 2=N.A., Supplier Part Number 2=N.A.
TP1 TP2 TP3 TP4 TP5 TP6 TP7 TP8 TP9 TP10 TP11 TP12 TP13 TP14 TP15 TP16 TP17 TP18 TP19 TP20 TP21: library part TP_SMD_Ø1.5MM, "1.5mm circular SMD testpad", Manufacturer="Nordic Semiconductor", Manufacturer Part Number=N.A., Artikkelnr Noca=N.A., Author=rsk, Component Class=Connectors, ComponentLink1Description=Datasheet, ComponentLink1URL=N.A., ComponentLink2Description="Supplier link", ComponentLink2URL=N.A., Footprint Doc=TP_SMD_Ø1.5mm, HelpURL=N.A., LatestRevisionDate=2021-03-05, Note=N.A., Pad Count=1, Part Number=TP_SMD_Ø1.5MM, Part number IPS=N.A., Part number Norautron=N.A., PartId=100500477, Published=2016-06-02, Supplier 1=N.A., Supplier 2=N.A., Supplier Part Number 1=N.A., Supplier Part Number 2=N.A.
U1: "Li-Ion/Li-Polymer USB battery charger with a high efficiency buck regulator", Manufacturer="Nordic Semiconductor", Part number IPS=N.A., Artikkelnr Noca=N.A., Author=rubr, Component Class=nRF_Devices, ComponentLink1Description=Datasheet, ComponentLink1URL=N.A., ComponentLink2Description="Supplier link", ComponentLink2URL=N.A., Footprint Doc=WLCSP-25, HelpURL=N.A., LatestRevisionDate=2021-04-21, Manufacturer Part Number=nPM1100-CAAAC0, Note=N.A., Pad Count=25, Part Number=nPM1100-CAAAC0, Part number Norautron=N.A., PartId=102000225, Published=2021-04-21, Supplier 1="Nordic Semiconductor", Supplier 2=N.A., Supplier Part Number 1=N.A., Supplier Part Number 2=N.A.

## Free pads (board coordinates)
  round 5 hole 122.05 unplated: 0(157.48,157.48) 0(157.48,2342.52) 0(1968.5,2342.52) 0(1968.5,157.48)
  round 11.81 on Mech16 mask+3: 2(1058.62,1027.56) 3(1074.37,1027.56) 4(1074.37,1043.31) 5(1058.62,1043.31) 6(1058.62,1059.06) 7(1074.37,1059.06) 8(1145,1105)

## Via types
v1: diameter 19.68, hole 9.84, Top Layer to Bottom Layer, tented both sides, 673 vias
v2: diameter 11.81, hole 3.94, Top Layer to Mid-Layer 1, tented top, 8 vias
v3: diameter 11.81, hole 3.94, Top Layer to Mid-Layer 1, tented both sides, 1 vias

## Nets (pads, with @x,y where several pads share a name; then routed paths per layer and width w, separated by ;. In a path a pad name is that pad's centre, name@x,y a point inside that pad or via, vN(x,y) a via of type N, cw(c..) or ccw(c..) an arc to the next point about the centre after c; other vN are vias at no path point)
CHG: LD2.1 P7.8 TP14.1 U1.E4 | length 2061.6
  Top Layer w5.91: U1.E4@1090.37,1366.81 1090.37,1328.63 1142,1277 v1(1824,1277)
  Top Layer w8: v1(1824,506) 1990.74,506 LD2.1@2019.92,476.81 ; v1(1824,841) P7.8@1930.51,841 P7.8@2045.87,841
  Bottom Layer w8: TP14.1@1764,822.84 1782.16,841 v1(1824,841) ; v1(1824,506) v1(1824,841) ; v1(1824,1277) v1(1824,841)
D_N: D1.3 J2.2 P7.1 TP3.1 U1.A1 | length 2176